# Altium PCB LORAPROJ_.PcbDoc (part 1 of 2)
Units mil, origin at the board's own origin, x right, y up, seen from the top; angles counter-clockwise.
Board outline 1950 x 1800 mil, 4 copper layers (Top Layer, L2 GND, L3 PWR, Bottom Layer), stack 62.45 mil thick; 95 components, 67 nets, 324 pads, 462 vias.
Unrouted connection lines stored in the file: 72.
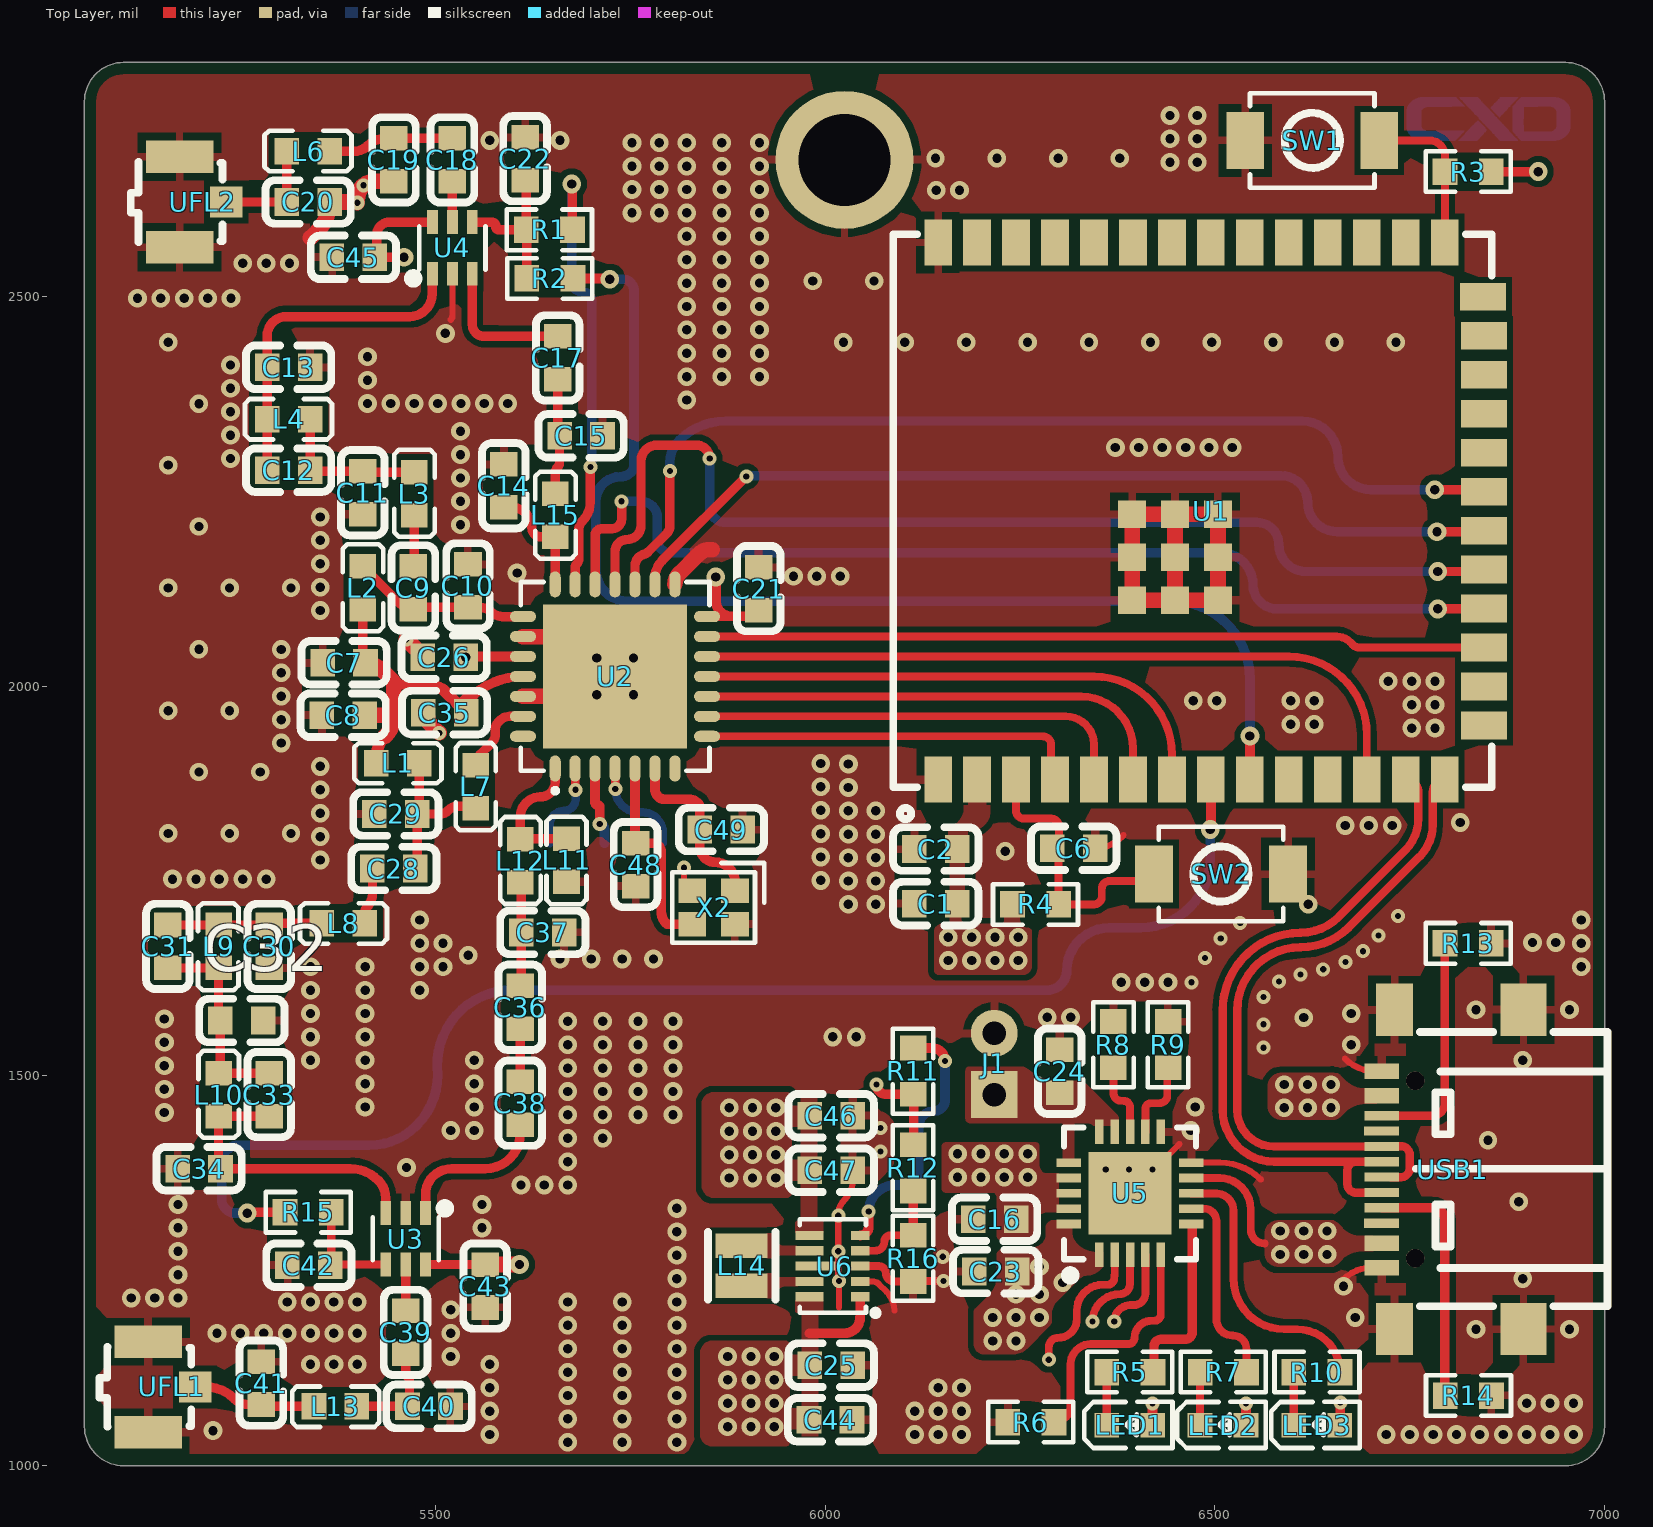
[diagram p0: Top Layer view]
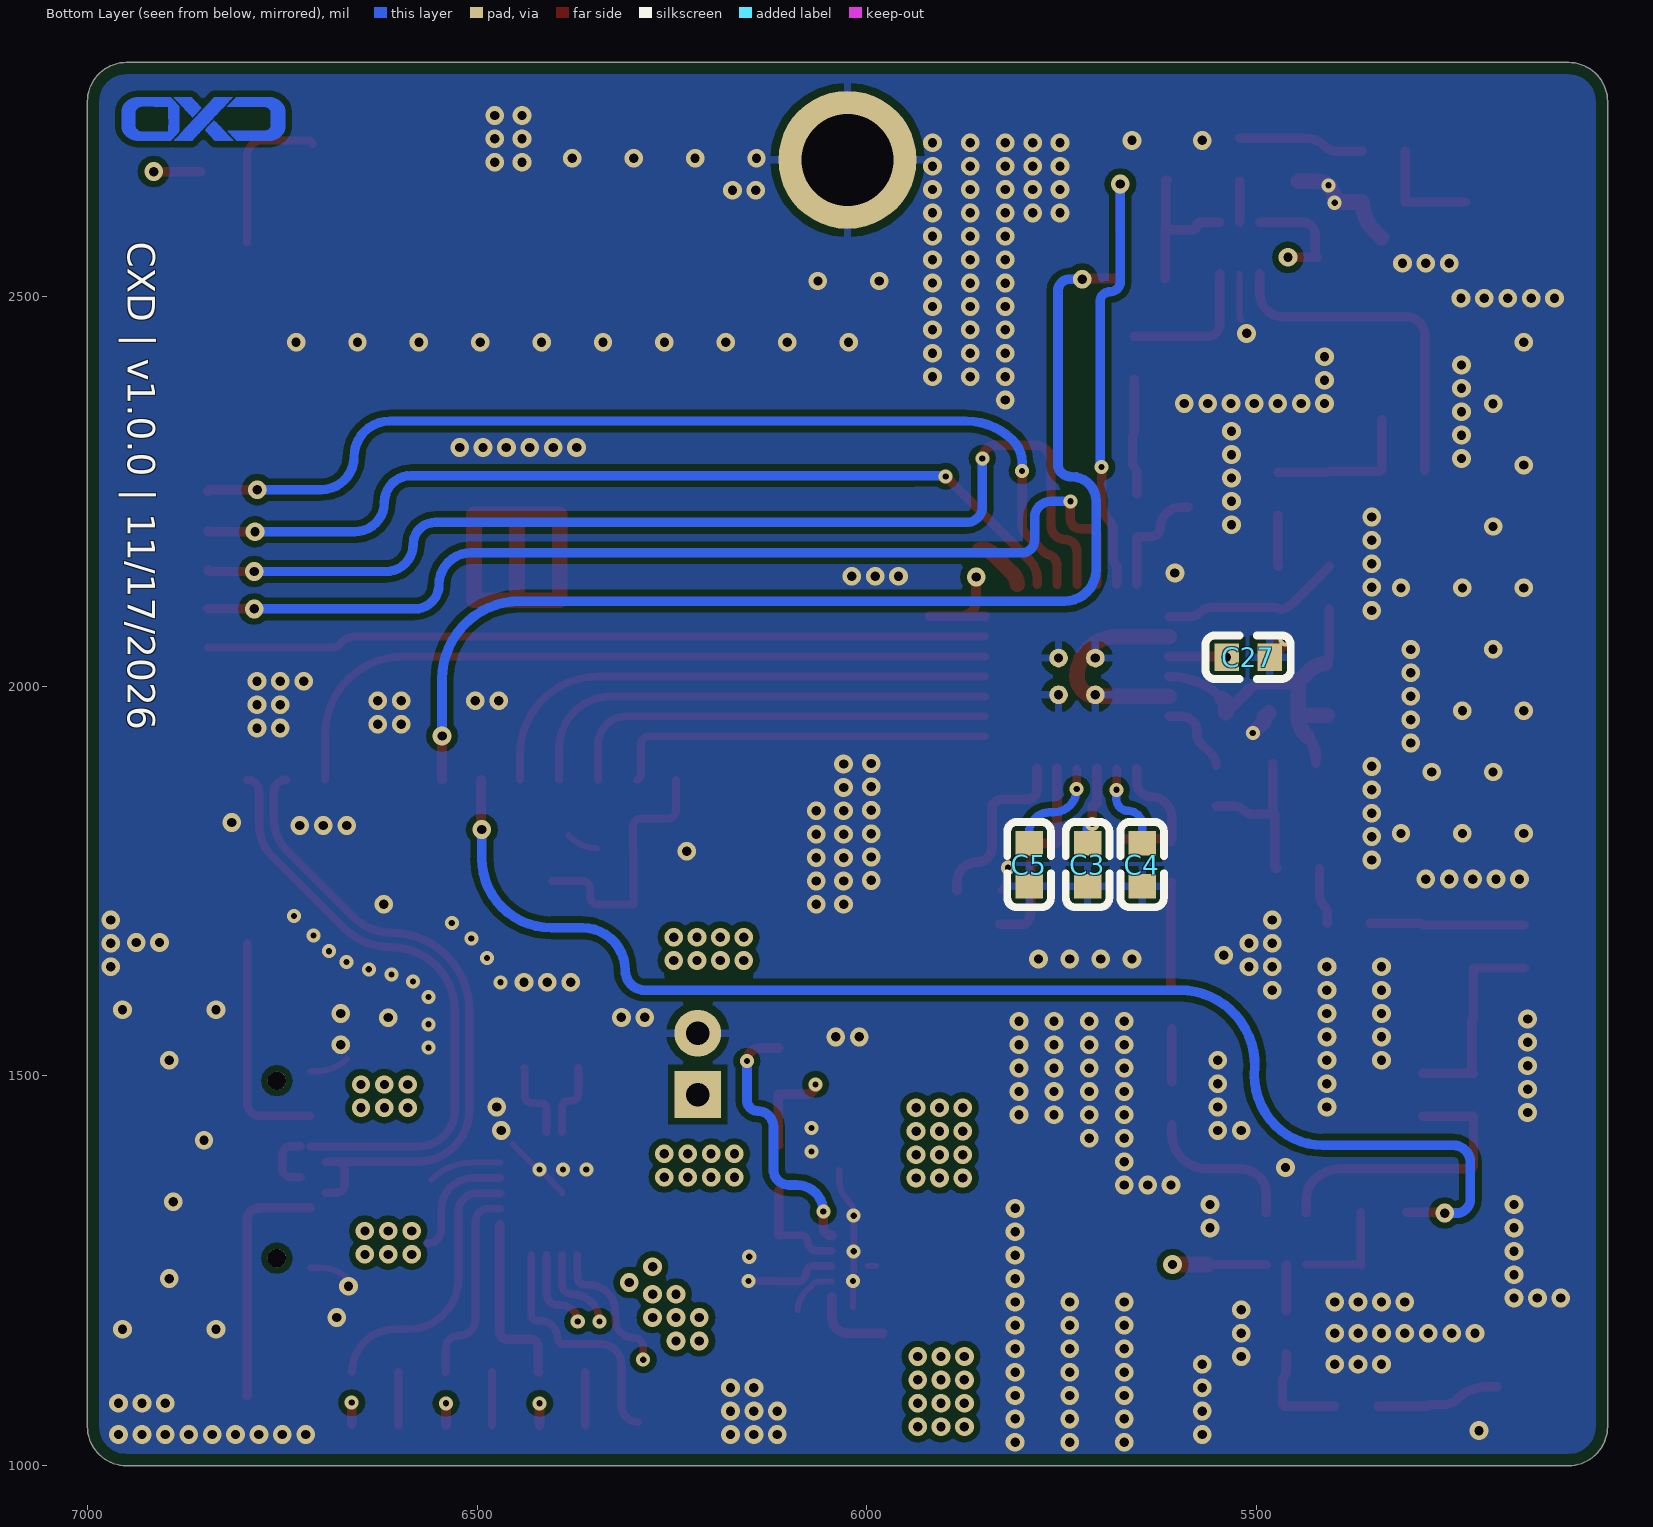
[diagram p1: Bottom Layer view, seen from below]
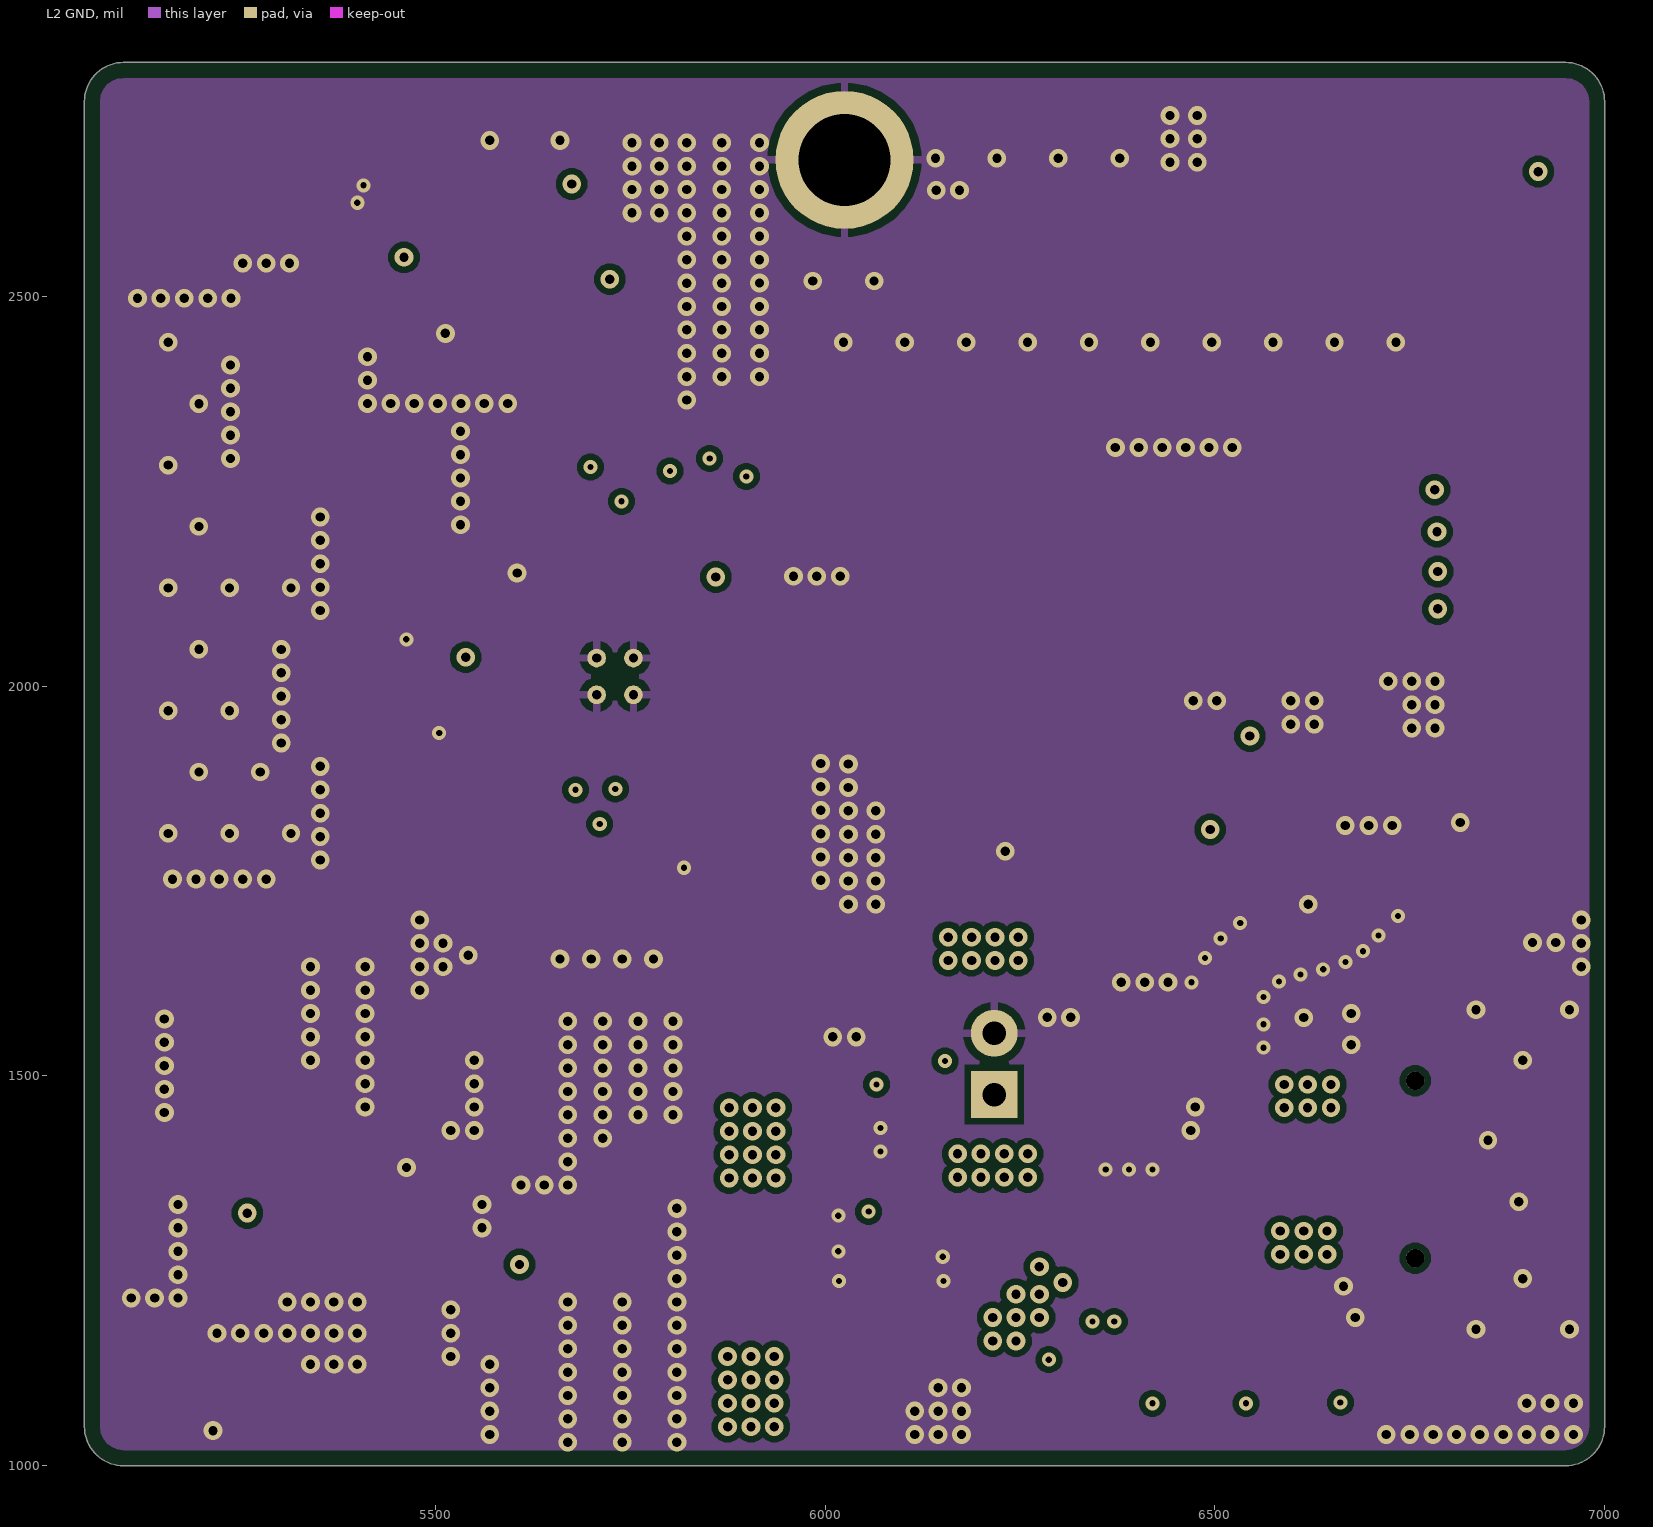
[diagram p2: L2 GND]
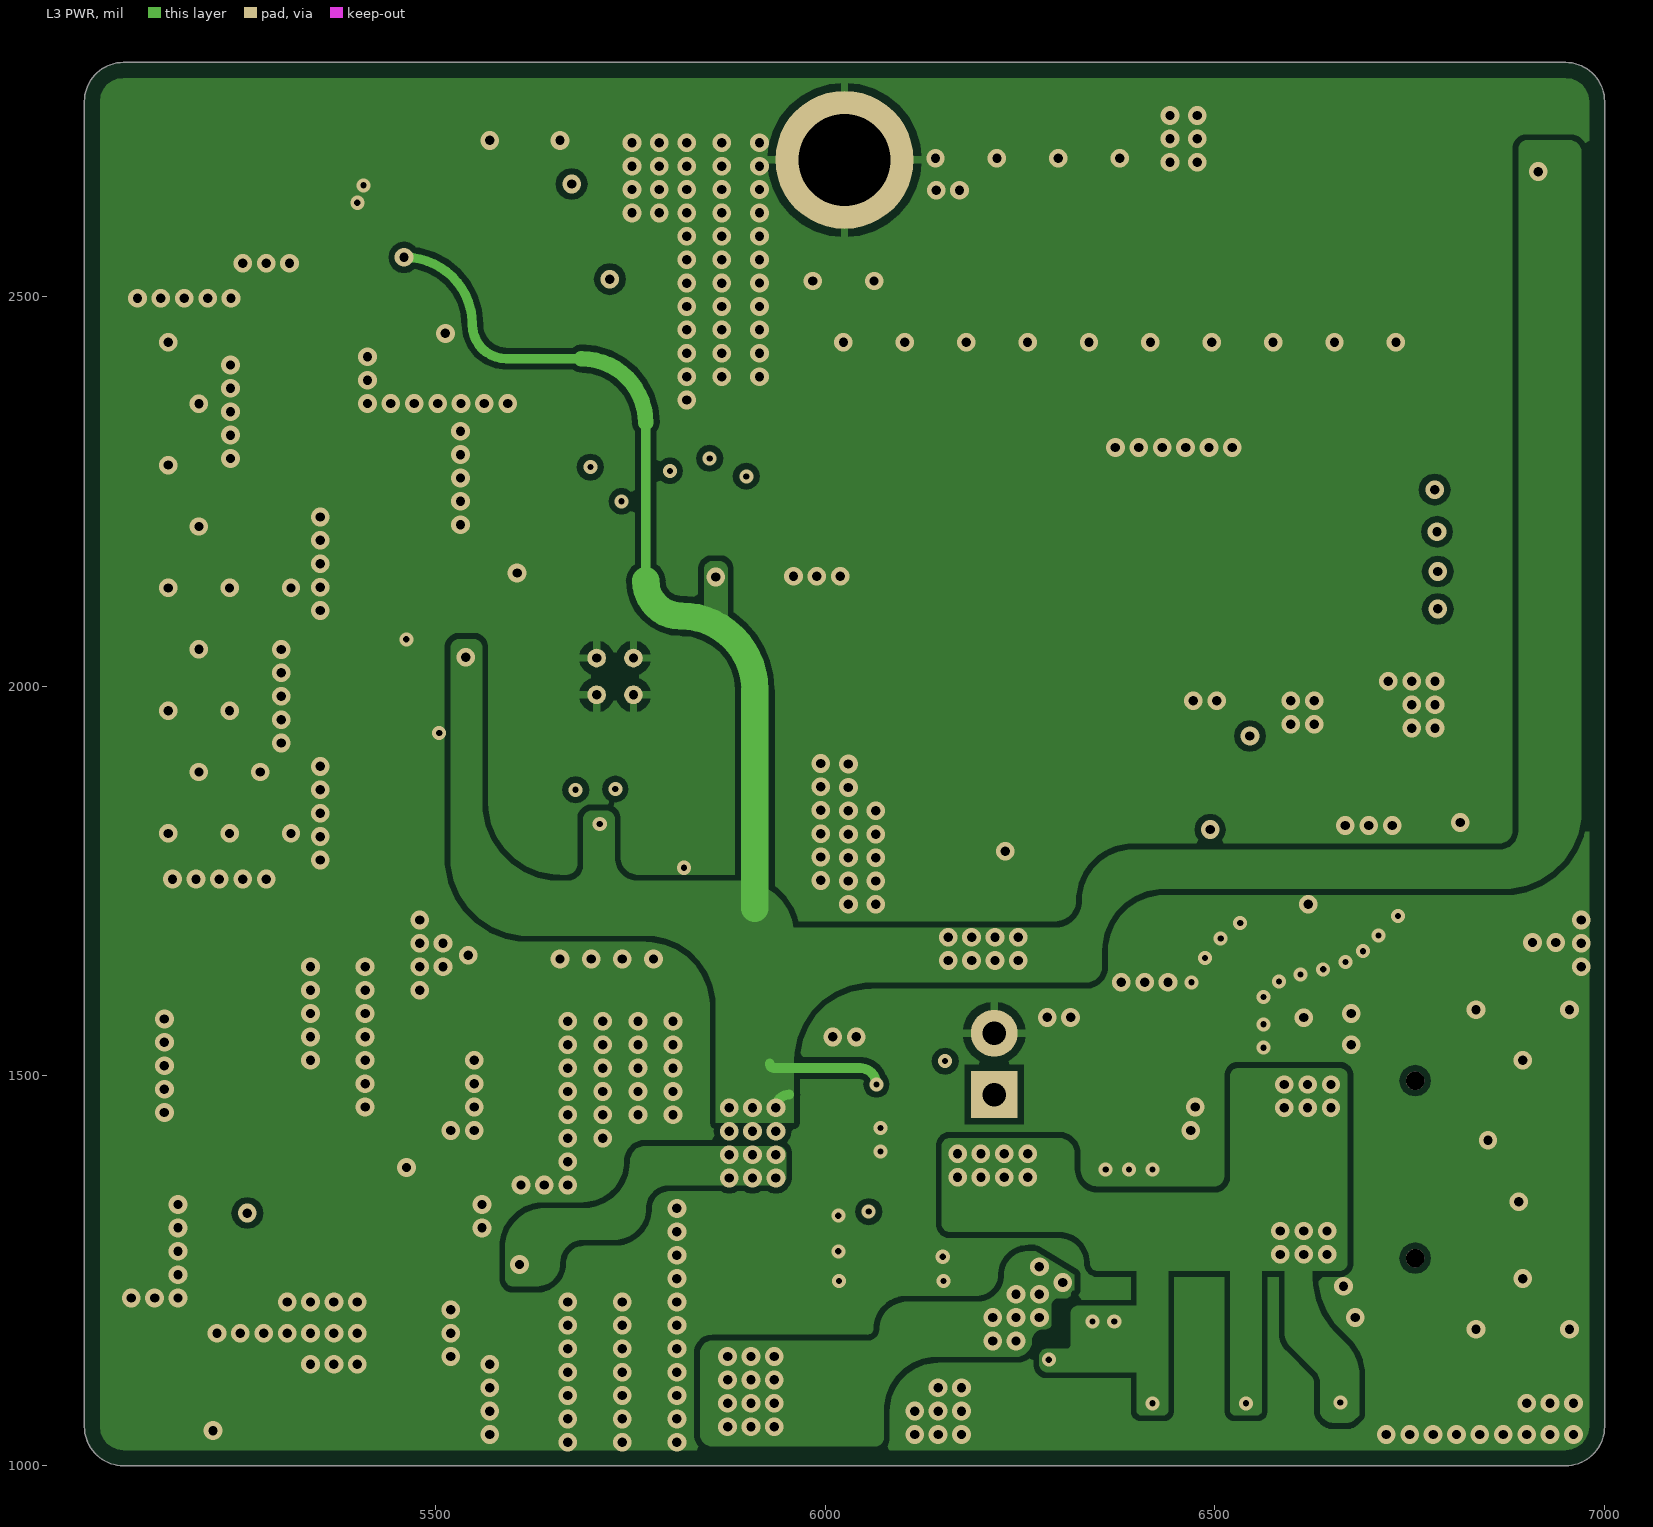
[diagram p3: L3 PWR]
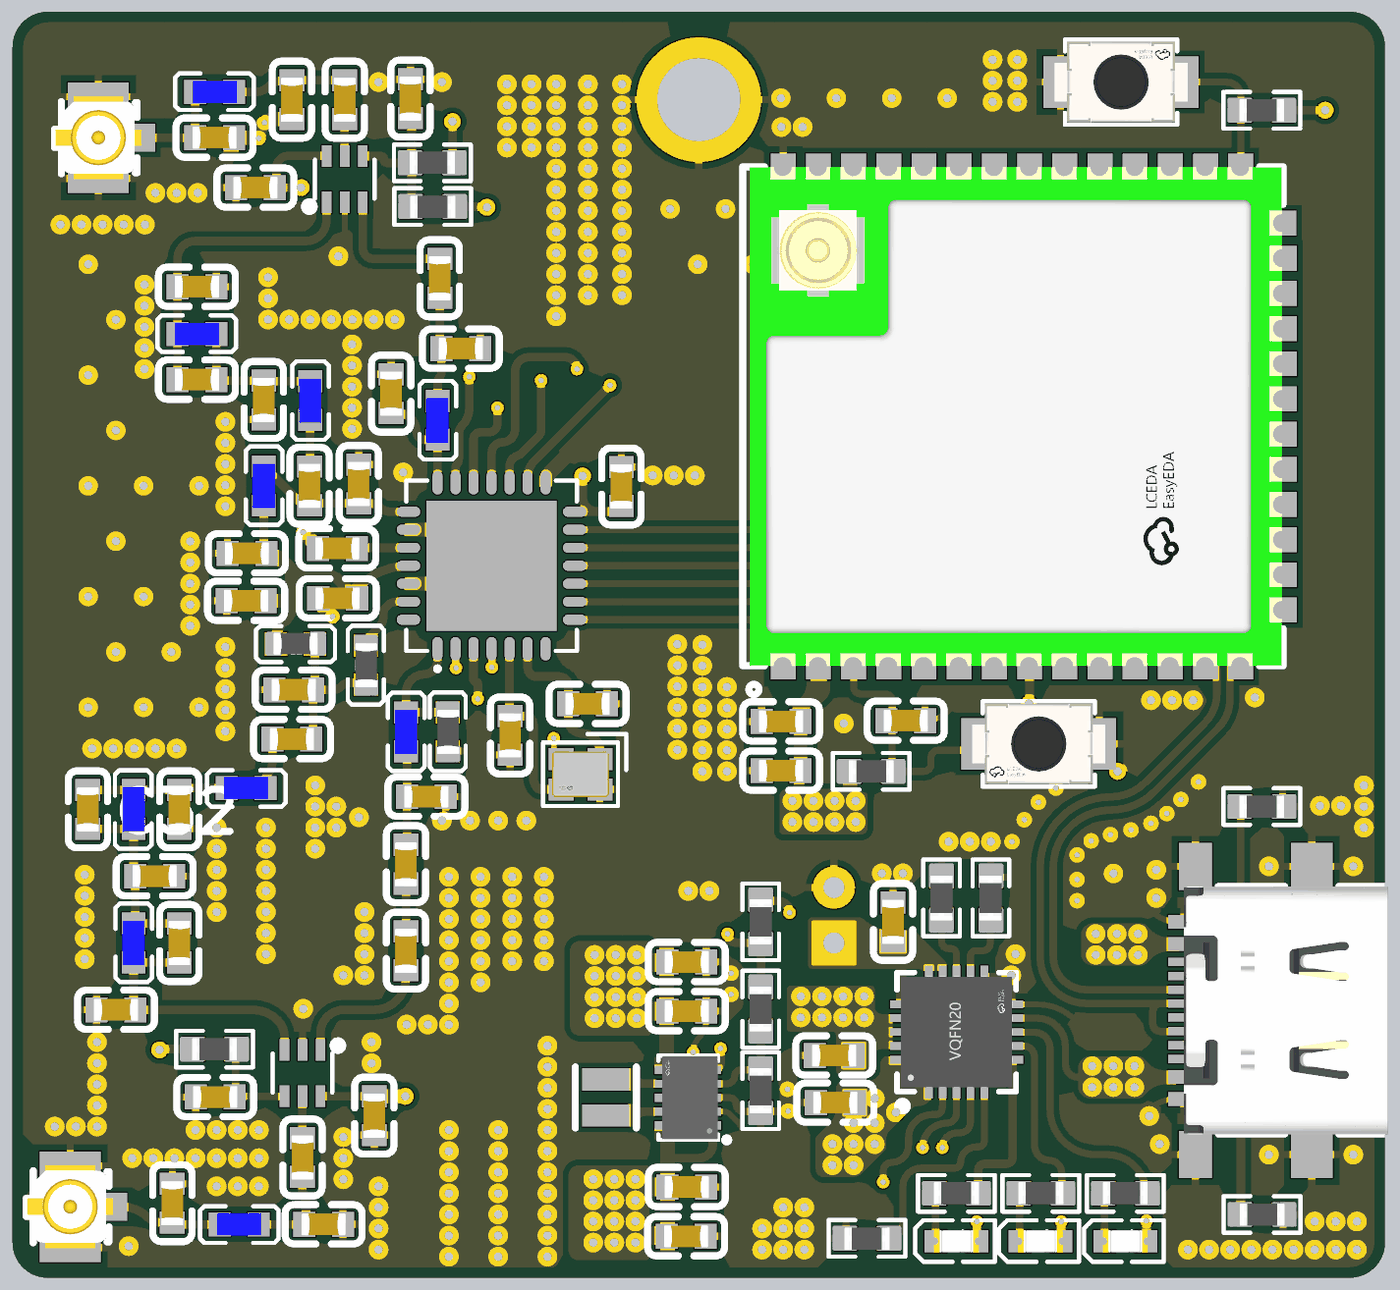
[diagram p5: 3D render of the assembled board from above, using the file's embedded part models]
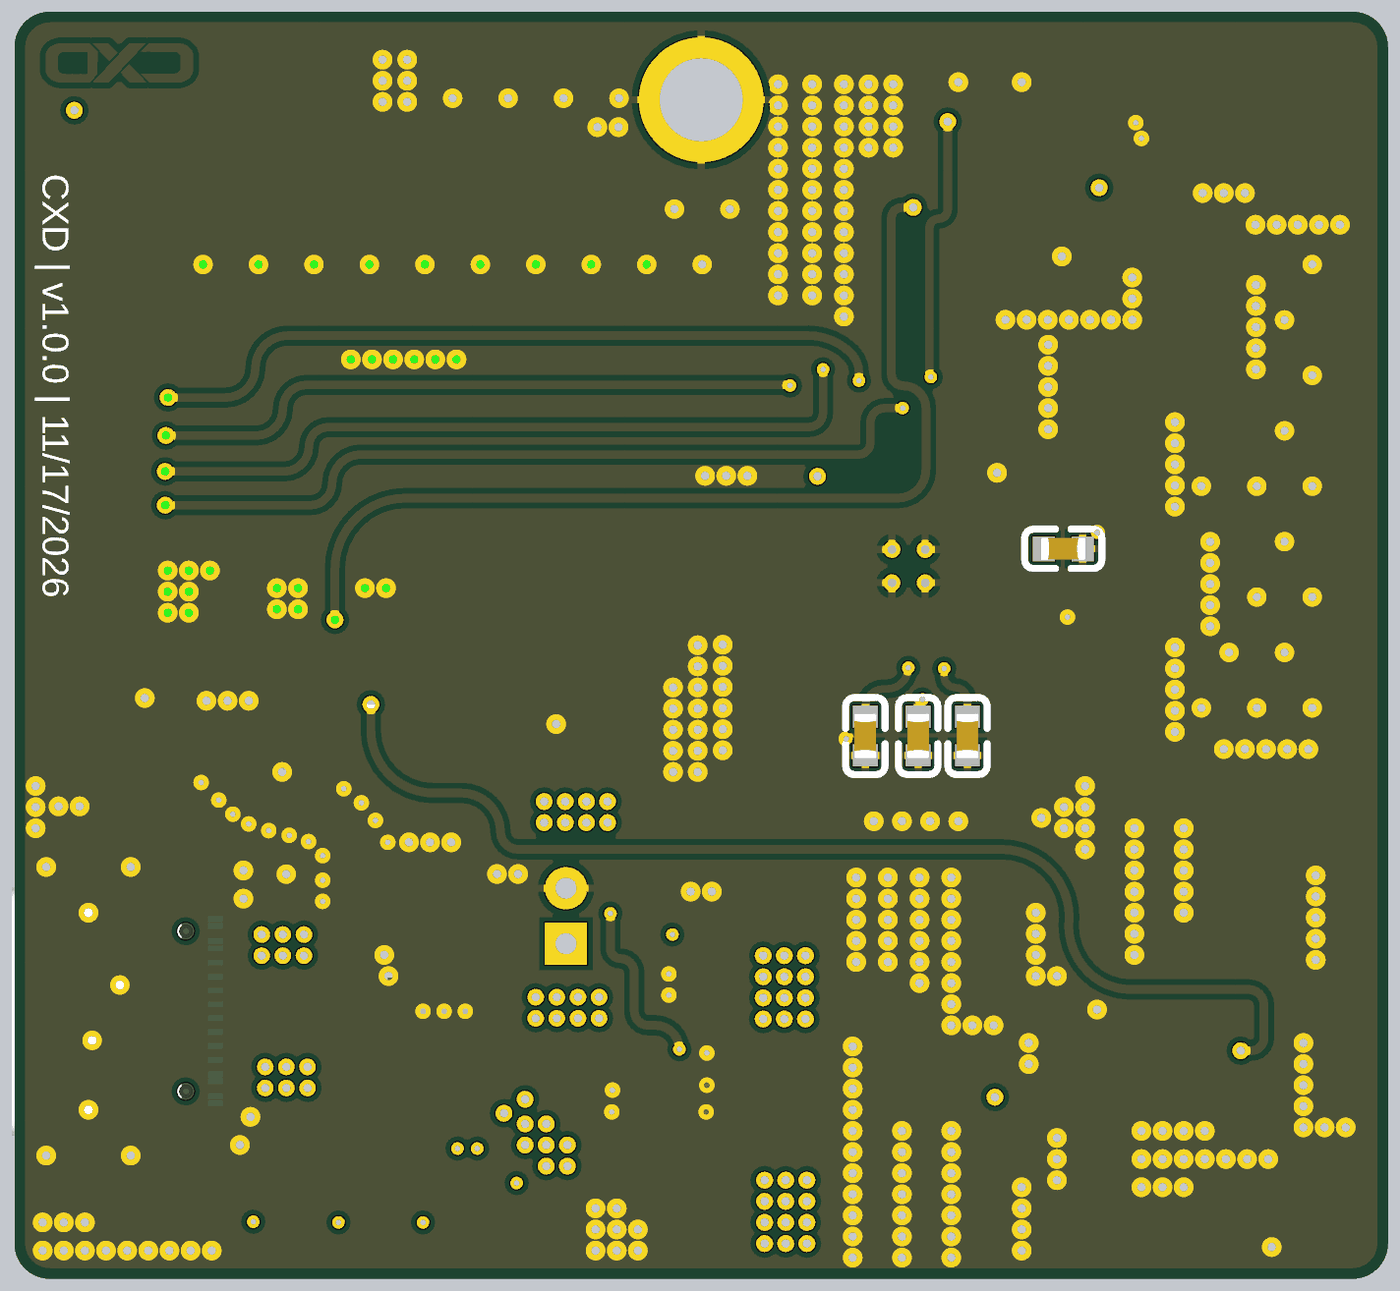
[diagram p6: 3D render of the assembled board from below, using the file's embedded part models]

## Layer stack, top to bottom
Top Solder: solder mask 0.4, Solder Resist, Dk 3.5
Top Layer: signal copper 1.38
Dielectric 1: prepreg 8.28, 7628 prepreg, Dk 4.4
L2 GND: signal copper 0.6
Dielectric2: core 41.93, FR-4 core, Dk 4.6
L3 PWR: signal copper 0.6
Dielectric3: prepreg 8.28, 7628 prepreg, Dk 4.4
Bottom Layer: signal copper 1.38
Bottom Solder: solder mask 0.4, Solder Resist, Dk 3.5

## Board outline
5050,1050 ccw(c5100,1050) 5100,1000 6950,1000 ccw(c6950,1050) 7000,1050 7000,2750 ccw(c6950,2750) 6950,2800 5100,2800 ccw(c5100,2750) 5050,2750

## Design rules (kind name [scope] priority, off if disabled: settings)
Clearance Clearance_GND_Pour [InPolygon And InNet('GND') vs Not InNetClass('RF')] p1: gap=8 ignorepadtopadclearanceinfootprint=FALSE // Pour-to-other-net clearance for manufacturability; RF excluded to keep GCPW 8 mil gap
Clearance Clearance_RF_GCPW [InNetClass('RF') vs InNet('GND')] p2: gap=8 ignorepadtopadclearanceinfootprint=FALSE // GCPW gap 0.2 mm between RF traces and GND pour
Clearance [All] p3: gap=6 ignorepadtopadclearanceinfootprint=FALSE // General clearance 0.15 mm (JLCPCB capable)
DiffPairsRouting [All] p1: maxlimit=8 minlimit=8 mostfreqgap=8 toplayer_minwidth=10.64 toplayer_maxwidth=10.64 toplayer_prefwidth=10.64 midlayer1_minwidth=10.64 midlayer1_maxwidth=10.64 midlayer1_prefwidth=10.64 midlayer2_minwidth=10.64 midlayer2_maxwidth=10.64 midlayer2_prefwidth=10.64 bottomlayer_minwidth=10.64 bottomlayer_maxwidth=10.64 bottomlayer_prefwidth=10.64 maxuncoupledlength=500
HoleSize [All] p1: absolutevalues=TRUE maxlimit=250 minlimit=8 maxpercent=80.000 minpercent=20.000 // JLCPCB min drill 0.2 mm
MinimumSolderMaskSliver [IsPad] p1: minsoldermaskwidth=3.5 // Relaxed from 10 mil (All,All): 3.5 mil, pads only. Via-to-via mask webs between stitching vias are not checked.
PolygonConnect GND_POUR_MAIN_Vias [IsVia vs IsPolygon And InNet('GND')] p1: connectstyle=Direct reliefconductorwidth=10 reliefentries=4 polygonreliefangle="90 Angle" airgapwidth=10 // Vias connect solid into all GND pours
PolygonConnect GND_POUR_MAIN [All vs IsPolygon And InNet('GND')] p2: connectstyle=Relief reliefconductorwidth=10 reliefentries=4 polygonreliefangle="90 Angle" airgapwidth=10 // Relief connects for pads on all GND pours
PolygonConnect PolygonConnect_1 [All] p3: connectstyle=Direct reliefconductorwidth=10 reliefentries=4 polygonreliefangle="90 Angle" airgapwidth=10
PolygonConnect PolygonConnect_Vias [IsVia] p4: connectstyle=Direct reliefconductorwidth=10 reliefentries=4 polygonreliefangle="90 Angle" airgapwidth=10 // Stitching / fence vias: direct connect
PolygonConnect PolygonConnect_SX1276 [InComponent('U2')] p5: connectstyle=Direct reliefconductorwidth=10 reliefentries=4 polygonreliefangle="90 Angle" airgapwidth=10 // SX1276 GND pins and exposed pad: direct connect for RF ground
PolygonConnect [All] p6: connectstyle=Relief reliefconductorwidth=10 reliefentries=4 polygonreliefangle="90 Angle" airgapwidth=10 // General pads: thermal relief 0.25 mm spokes
RoutingVias [All] p1: holewidth=12 width=24 viastyle="Through Hole" minholewidth=8 minwidth=16 maxholewidth=16 maxwidth=32 // Preferred via 0.3 mm hole / 0.6 mm pad
SilkToSilkClearance [All] p1 off: silktosilkclearance=4 // Disabled during layout: all violations are designator text collisions. Re-enable for silkscreen cleanup before fab.
SilkToSolderMaskClearance [IsPad] p1 off: minsilkscreentomaskgap=4 clearancetoexposedcopper=TRUE // Relaxed from 10 mil: 4 mil to mask opening = 6 mil (0.15 mm) to pad copper with 2 mil mask expansion
SolderMaskExpansion [All] p1: expansion=2 istentingtop=FALSE // 0.05 mm mask expansion
SupplyNets "Schematic Supply Nets_2" [InNet('+5')] p1: voltage=0.000
SupplyNets "Schematic Supply Nets_1" [InNet('GND')] p2: voltage=0.000
SupplyNets "Schematic Supply Nets" [InNet('+3.3')] p3: voltage=0.000
Width Width_RF_50ohm [InNetClass('RF')] p1: maxlimit=12.5 minlimit=11.5 preferedwidth=12.04 // 50 ohm coplanar (GCPW) on JLC04161H-7628, L1 ref L2: 12.04 mil trace, 8 mil gap (JLCPCB calculator)
Width Width_PWR [InNetClass('PWR')] p2: maxlimit=80 minlimit=10 preferedwidth=20 minimp=50.000000 maximp=50.000000 favimp=50.000000 // Power nets: min 0.3 / pref 0.5 / max 2.0 mm
Width [All] p3: maxlimit=40 minlimit=5 preferedwidth=10 minimp=50.000000 maximp=50.000000 favimp=50.000000 // General signals: min 0.127 / pref 0.2 / max 1.0 mm
25 further rules are at their usual default settings.

## Classes and differential pairs
component class Sheet3: C3 C4 C5 C7 C8 C9 C10 C11 C12 C13 C14 C15 C17 C18 C19 C20 C21 C22 C26 C27 C28 C29 C30 C31 C32 C33 C34 C35 C36 C37 C38 C39 C40 C41 C42 C43 C45 C48 C49 L1 L2 L3 L4 L6 L7 L8 L9 L10 L11 L12 L13 L15 R1 R2 R15 U2 U3 U4 UFL1 UFL2 X2
component class Sheet2: C16 C23 C24 C25 C44 C46 C47 J1 L14 LED1 LED2 LED3 R5 R6 R7 R8 R9 R10 R11 R12 R13 R14 R16 U5 U6 USB1
component class Sheet1: C1 C2 C6 R3 R4 SW1 SW2 U1
differential pair USB: +USB_P -USB_N

## Components (designator, comment, footprint, x,y, rotation, side; value= is the part's Value field where it differs from the comment)
C1 "CL10A106KP8NNNC" C19702 6142,1721 r0 top value=10µF
C2 "CL10B104KB8NNNC" C1591 6142,1791 r0 top value=100nF
C3 "CL10B104KB8NNNC" C1591 5717,1771 r270 bottom value=100nF
C4 "CL10B104KB8NNNC" C1591 5647,1771 r270 bottom value=100nF
C5 "CL10B104KB8NNNC" C1591 5792,1771 r270 bottom value=100nF
C6 "CL10A475KO8NNNC" C19666 6319,1792 r180 top value=4.7µF
C7 "CC0603JRNPO9BN101" C14665 5383,2030 r0 top value=100pF
C8 "CL10C470JB8NNNC" C1671 5381.88,1962.56 r0 top value=47pF
C9 "CL10C330JB8NNNC" C1663 5472,2126 r90 top value=33pF
C10 "CC0603BRNPO9BN1R5" C519100 5542,2128.56 r270 top value=1.5pF
C11 "0603CG3R3C500NT" C1660 5407,2248 r90 top value=3.3pF
C12 "GQM1875C2E1R2BB12D" C913582 5312,2277 r180 top value=1.2pF
C13 "0603CG3R3C500NT" C1660 5312,2409 r180 top value=3.3pF
C14 "DNP" C17388964 5588,2257 r270 top
C15 "GCM1885C2A7R5BA16D" C17388964 5687,2321 r180 top value=7.5pF
C16 "CL10A475KO8NNNC" C19666 6217.44,1316 r0 top value=4.7µF
C17 "CL10C470JB8NNNC" C1671 5657,2421 r270 top value=47pF
C18 "CL10C330JB8NNNC" C1663 5522,2675 r90 top value=33pF
C19 "0603CG3R3C500NT" C1660 5447,2675 r90 top value=3.3pF
C20 "0603CG3R3C500NT" C1660 5337,2621 r180 top value=3.3pF
C21 "CL10B104KB8NNNC" C1591 5915,2125 r270 top value=100nF
C22 "CL10B102KB8NNNC" C1588 5615.28,2676.55 r270 top value=1nF
C23 "CL10A475KO8NNNC" C19666 6219,1249 r0 top value=4.7µF
C24 "CL10A475KO8NNNC" C19666 6301,1506 r270 top value=4.7µF
C25 "CL10A226MP8NUNE" C86295 6008,1129 r180 top value=22µF
C26 "CL10C470JB8NNNC" C1671 5511.44,2037 r0 top value=47pF
C27 "CL10B104KB8NNNC" C1591 5511,2037 r0 bottom value=100nF
C28 "CL10C470JB8NNNC" C1671 5447,1766 r180 top value=47pF
C29 "CC0603JRNPO9BN130" C107036 5449.44,1836 r0 top value=13pF
C30 "CC0603JRNPO9BN110" C519393 5287,1666 r270 top value=11pF
C31 "0603CG2R2C500NT" C1651 5157,1666 r270 top value=2.2pF
C32 "CC0603CRNPO9BN4R3" C519375 5252,1571 r180 top value=4.3pF
C33 "DNP" C17388964 5287,1476 r90 top
C34 "DNP" C17388964 5197,1381 r180 top
C35 "CC0603KRX7R9BB103" C100042 5512,1966 r0 top value=10nF
C36 "CC0603BRNPO9BN2R0" C513620 5609,1588 r270 top value=2pF
C37 "DNP" C17388964 5638,1684 r0 top
C38 "CL10C470JB8NNNC" C1671 5609,1465 r270 top value=47pF
C39 "CL10C470JB8NNNC" C1671 5462,1171 r270 top value=47pF
C40 "DNP" C17388964 5492,1076 r0 top
C41 "DNP" C17388964 5277,1106 r90 top
C42 "CL10B102KB8NNNC" C1588 5338,1257 r0 top value=1nF
C43 "CL10B102KB8NNNC" C1588 5564,1230.44 r90 top value=1nF
C44 "CL10B104KB8NNNC" C1591 6007,1059 r180 top value=100nF
C45 "CL10B102KB8NNNC" C1588 5395,2550 r0 top value=1nF
C46 "CL10A226MP8NUNE" C86295 6008,1449 r180 top value=22µF
C47 "CL10B104KB8NNNC" C1591 6008,1379 r180 top value=100nF
C48 "CC0603JRNPO9BN120" C107034 5757,1771 r90 top value=12pF
C49 "CC0603JRNPO9BN120" C107034 5867,1816 r180 top value=12pF
J1 "2.0 2P" "2.0 2P-Footprint-1" 6217,1476 r90 top
L1 "LQW18AN47NG00D" C98076 5452,1901 r0 top value=47nH
L2 "LQW18AN33NG00D" C98073 5407,2126 r270 top value=33nH
L3 "AHW1608C-6N8JTF" C6807999 5473,2247 r270 top value=6.8nH
L4 "LQW18AN6N2C00D" C98083 5312,2342 r0 top value=6.2nH
L6 "LQW18AN8N2D00D" C98087 5337,2686 r0 top value=8.2nH
L7 "LQW18AN4N3C00D" C113127 5552,1871 r270 top value=4.3nH
L8 "LQW18AN11NG00D" C701196 5382,1696 r180 top value=11nH
L9 "LQW18AN12NG00D" C98068 5222,1666 r90 top value=12nH
L10 "RC0603JR-070RL" C701196 5222,1476 r270 top value=0R
L11 "LQW18AN15NG00D" C86132 5668.37,1776.39 r270 top value=15nH
L12 "RC0603JR-070RL" C701196 5609,1776 r270 top value=0R
L13 "RC0603JR-070RL" C701196 5372,1076 r180 top value=0R
L14 "hctc-201610-1r0-m" Inductor 5926.31,1223.1 r90 top
L15 "LQW18AN12NG00D" C98068 5654,2219 r270 top value=12nH
LED1 "HL-PST-1608H233W(9000-16000K)" C219226 6391,1052 r0 top
LED2 "HL-PST-1608H233W(9000-16000K)" C219226 6510.49,1052.01 r0 top
LED3 "HL-PST-1608H233W(9000-16000K)" C219226 6631,1052 r0 top
R1 "NC" C22548 5646.45,2585.28 r0 top
R2 "RC0603FR-071KL" C22548 5647,2523 r180 top value=1k
R3 "RC0603FR-0710KL" C98220 6825,2660 r180 top value=10k
R4 "RC0603FR-0710KL" C98220 6270,1720 r0 top value=10k
R5 "RC0603FR-075K1L" C105580 6391,1120 r0 top value=5.1k
R6 "RC0603FR-0710KL" C98220 6264,1056 r180 top value=10k
R7 "RC0603FR-075K1L" C105580 6511,1120 r0 top value=5.1k
R8 "0603WAF2001T5E" C22975 6370,1540 r90 top value=2k
R9 "RC0603FR-0710KL" C98220 6440,1540 r90 top value=10k
R10 "RC0603FR-075K1L" C105580 6631,1120 r0 top value=5.1k
R11 "RC0603FR-07100KL" C14675 6113,1506 r270 top value=100k
R12 "RT0603BRD07511KL" C861454 6113,1382 r90 top value=511k
R13 "RC0603FR-075K1L" C105580 6825,1670 r180 top value=5.1k
R14 "RC0603FR-075K1L" C105580 6825.34,1090 r180 top value=5.1k
R15 "RC0603FR-071KL" C22548 5337,1325 r0 top value=1k
R16 "RC0603FR-0791KL" C137671 6113,1266 r90 top value=91k
SW1 "TS-1088-AR02016" C720477 6625,2700 r0 top
SW2 "TS-1088-AR02016" C720477 6508,1759 r180 top
U1 "ESP32-S3-WROOM-1U-N16R8" C3013946 6495.19,2224.49 r90 top
U2 "SX1276IMLTRT" C80171 5730.62,2012.38 r0 top value=-
U3 "PE4259-63" C470892 5462,1291 r180 top
U4 "PE4259-63" C470892 5522,2562 r0 top
U5 "MCP73871-2CCI/ML" C5121473 6391.26,1349.37 r0 top
U6 "TPS63802DLAT" C1849531 6012.61,1256 r90 top
UFL1 "U.FL-R-SMT-1(80)" C88374 5162,1101 r90 top
UFL2 "U.FL-R-SMT-1(80)" C88374 5202,2621 r90 top
USB1 "TYPE-C 16P QTWT" C5187472 6805,1380 r90 top
X2 "XL7EL89CKI-111YLC-32M" C2965582 5857,1716 r180 top value=32MHz

## Footprints (in the part's own frame and the unit in brackets; to place one, negate y for a bottom-side part, rotate by r counter-clockwise, add the part's x,y. Pads: shape width x height; smd on the part's side, far side on the other; paste and mask are expansions set on the pad)
"2.0 2P-Footprint-1" [mil]
  rect 60x60 hole 30: 1(0,0)
  round 60 hole 30: 2(78.74,0)
C1588 [mm]
  rect 0.8x0.9 smd paste+0 mask+0.051: 1(-0.7,0) 2(0.7,0)
  silkscreen extent -1.39,-0.71 1.39,0.71, body extent -0.8,-0.4 0.8,0.4, height 0.4
C1591 [mm]
  rect 0.8x0.9 smd paste+0 mask+0.051: 1(-0.7,0) 2(0.7,0)
  silkscreen extent -1.39,-0.71 1.39,0.71, body extent -0.8,-0.4 0.8,0.4, height 0.4
C1651 [mm]
  rect 0.8x0.9 smd paste+0 mask+0.051: 1(-0.7,0) 2(0.7,0)
  silkscreen extent -1.39,-0.71 1.39,0.71, body extent -0.8,-0.4 0.8,0.4, height 0.4
C1660 [mm]
  rect 0.8x0.9 smd paste+0 mask+0.051: 1(-0.7,0) 2(0.7,0)
  silkscreen extent -1.39,-0.71 1.39,0.71, body extent -0.8,-0.4 0.8,0.4, height 0.4
C1663 [mm]
  rect 0.8x0.9 smd paste+0 mask+0.051: 1(-0.7,0) 2(0.7,0)
  silkscreen extent -1.39,-0.71 1.39,0.71, body extent -0.8,-0.4 0.8,0.4, height 0.4
C1671 [mm]
  rect 0.8x0.9 smd paste+0 mask+0.051: 1(-0.7,0) 2(0.7,0)
  silkscreen extent -1.39,-0.71 1.39,0.71, body extent -0.8,-0.4 0.8,0.4, height 0.4
C14665 [mm]
  rect 0.8x0.9 smd paste+0 mask+0.051: 1(-0.7,0) 2(0.7,0)
  silkscreen extent -1.39,-0.71 1.39,0.71, body extent -0.8,-0.4 0.8,0.4, height 0.4
C14675 [mil]
  rect 31.75x34.02 smd paste-3937.01 mask+2: 1(-29.66,0) 2(29.66,0)
  silkscreen extent -55,-26 55,26, body extent -32,-16 32,16, height 17
C19666 [mm]
  rect 0.8x0.9 smd paste+0 mask+0.051: 1(-0.7,0) 2(0.7,0)
  silkscreen extent -1.39,-0.71 1.39,0.71, body extent -0.8,-0.4 0.8,0.4, height 0.4
C19702 [mm]
  rect 0.8x0.9 smd paste+0 mask+0.051: 1(-0.7,0) 2(0.7,0)
  silkscreen extent -1.39,-0.71 1.39,0.71, body extent -0.8,-0.4 0.8,0.4, height 0.4
C22548 [mil]
  rect 31.75x34.02 smd paste-3937.01 mask+2: 1(-29.66,0) 2(29.66,0)
  silkscreen extent -55,-26 55,26, body extent -32,-16 32,16, height 17
C22975 [mil]
  rect 31.75x34.02 smd paste-3937.01 mask+2: 1(-29.66,0) 2(29.66,0)
  silkscreen extent -55,-26 55,26, body extent -32,-16 32,16, height 17
C80171 [mm]
  oval 0.364x0.847 smd paste+0 mask+0.051: 1(-1.95,-2.998) 2(-1.3,-2.998) 3(-0.65,-2.998) 4(0,-2.998) 5(0.65,-2.998) 6(1.3,-2.998) 7(1.95,-2.998) 15(1.95,2.998) 16(1.3,2.998) 17(0.65,2.998) 18(0,2.998) 19(-0.65,2.998) 20(-1.3,2.998) 21(-1.95,2.998)
  oval 0.847x0.364 smd paste+0 mask+0.051: 8(2.998,-1.95) 9(2.998,-1.3) 10(2.998,-0.65) 11(2.998,0) 12(2.998,0.65) 13(2.998,1.3) 14(2.998,1.95) 22(-2.998,1.95) 23(-2.998,1.3) 24(-2.998,0.65) 25(-2.998,0) 26(-2.998,-0.65) 27(-2.998,-1.3) 28(-2.998,-1.95)
  round 0.61 hole 0.305 paste-2539.97: 29(-0.6,-0.6) 29(-0.6,0.6) 29(0.6,-0.6) 29(0.6,0.6)
  rect 4.7x4.7 smd paste+0 mask+0.051: 29(0,0)
  silkscreen extent -3.08,-3.8 3.08,3.08
C86132 [mm]
  rect 0.8x0.864 smd paste-100 mask+0.051: 1(-0.7,0) 2(0.7,0)
  silkscreen extent -1.42,-0.65 1.42,0.65, body extent -0.8,-0.38 0.8,0.42, height 0.25
C86295 [mm]
  rect 0.8x0.9 smd paste+0 mask+0.051: 1(-0.7,0) 2(0.7,0)
  silkscreen extent -1.39,-0.71 1.39,0.71, body extent -0.8,-0.4 0.8,0.4, height 0.4
C88374 [mm]
  rect 1x1.05 smd paste+0 mask+0.05: 1(0,-0.762)
  rect 1.05x2.2 smd paste+0 mask+0.05: 2(-1.475,0.762) 3(1.475,0.762)
  silkscreen extent -1.3,-0.63 1.3,2.35, body extent -1.5,-0.79 1.5,2.31, height 1.25
C98068 [mm]
  rect 0.8x0.864 smd paste+0 mask+0.051: 1(0.7,0) 2(-0.7,0)
  silkscreen extent -1.42,-0.65 1.41,0.67, body extent -0.8,-0.4 0.81,0.4, height 0.7
C98073 [mm]
  rect 0.8x0.864 smd paste+0 mask+0.051: 1(0.7,0) 2(-0.7,0)
  silkscreen extent -1.42,-0.65 1.41,0.67, body extent -0.8,-0.4 0.81,0.4, height 0.7
C98076 [mm]
  rect 0.8x0.864 smd paste-100 mask+0.051: 1(-0.7,0) 2(0.7,0)
  silkscreen extent -1.42,-0.65 1.42,0.65, body extent -0.8,-0.38 0.8,0.42, height 0.25
C98083 [mm]
  rect 0.8x0.864 smd paste+0 mask+0.051: 1(0.7,0) 2(-0.7,0)
  silkscreen extent -1.42,-0.65 1.41,0.67, body extent -0.8,-0.4 0.81,0.4, height 0.7
C98087 [mm]
  rect 0.8x0.864 smd paste+0 mask+0.051: 1(0.7,0) 2(-0.7,0)
  silkscreen extent -1.42,-0.65 1.41,0.67, body extent -0.8,-0.4 0.81,0.4, height 0.7
C98220 [mil]
  rect 31.75x34.02 smd paste-3937.01 mask+2: 1(-29.66,0) 2(29.66,0)
  silkscreen extent -55,-26 55,26, body extent -32,-16 32,16, height 17
C100042 [mm]
  rect 0.8x0.9 smd paste+0 mask+0.051: 1(-0.7,0) 2(0.7,0)
  silkscreen extent -1.39,-0.71 1.39,0.71, body extent -0.8,-0.4 0.8,0.4, height 0.4
C105580 [mil]
  rect 31.75x34.02 smd paste-3937.01 mask+2: 1(-29.66,0) 2(29.66,0)
  silkscreen extent -55,-26 55,26, body extent -32,-16 32,16, height 17
C107034 [mm]
  rect 0.8x0.9 smd paste+0 mask+0.051: 1(-0.7,0) 2(0.7,0)
  silkscreen extent -1.39,-0.71 1.39,0.71, body extent -0.8,-0.4 0.8,0.4, height 0.4
C107036 [mm]
  rect 0.8x0.9 smd paste+0 mask+0.051: 1(-0.7,0) 2(0.7,0)
  silkscreen extent -1.39,-0.71 1.39,0.71, body extent -0.8,-0.4 0.8,0.4, height 0.4
C113127 [mm]
  rect 0.8x0.864 smd paste-100 mask+0.051: 1(-0.7,0) 2(0.7,0)
  silkscreen extent -1.42,-0.65 1.42,0.65, body extent -0.8,-0.38 0.8,0.42, height 0.25
C137671 [mil]
  rect 31.75x34.02 smd paste-3937.01 mask+2: 1(-29.66,0) 2(29.66,0)
  silkscreen extent -55,-26 55,26, body extent -32,-16 32,16, height 17
C219226 [mm]
  rect 0.8x0.8 smd paste+0 mask+0.051: 1(-0.749,0) 2(0.749,0)
  silkscreen extent -1.49,-0.75 1.39,0.76, body extent -0.81,-0.41 0.81,0.41, height 0.55
C470892 [mm]
  rect 0.35x0.78 smd paste+0 mask+0.051: 1(-0.65,-0.84) 2(0,-0.84) 3(0.65,-0.84) 4(0.65,0.84) 5(0,0.84) 6(-0.65,0.84)
  silkscreen extent -1.43,-1.14 1.08,0.7
C513620 [mm]
  rect 0.8x0.9 smd paste+0 mask+0.051: 1(-0.7,0) 2(0.7,0)
  silkscreen extent -1.39,-0.71 1.39,0.71, body extent -0.8,-0.4 0.8,0.4, height 0.4
C519100 [mm]
  rect 0.8x0.9 smd paste+0 mask+0.051: 1(-0.7,0) 2(0.7,0)
  silkscreen extent -1.39,-0.71 1.39,0.71, body extent -0.8,-0.4 0.8,0.4, height 0.4
C519375 [mm]
  rect 0.8x0.9 smd paste+0 mask+0.051: 1(-0.7,0) 2(0.7,0)
  silkscreen extent -1.39,-0.71 1.39,0.71, body extent -0.8,-0.4 0.8,0.4, height 0.4
C519393 [mm]
  rect 0.8x0.9 smd paste+0 mask+0.051: 1(-0.7,0) 2(0.7,0)
  silkscreen extent -1.39,-0.71 1.39,0.71, body extent -0.8,-0.4 0.8,0.4, height 0.4
C701196 [mm]
  rect 0.8x0.864 smd paste+0 mask+0.051: 1(0.7,0) 2(-0.7,0)
  silkscreen extent -1.42,-0.65 1.41,0.67, body extent -0.8,-0.4 0.81,0.4, height 0.7
C720477 [mm]
  rect 1.23x1.86 smd paste+0 mask+0.051: 1(-2.185,0) 2(2.185,0)
  silkscreen extent -2.03,-1.54 2.03,1.54, body extent -2.4,-1.45 2.4,1.45, height 1.95
C861454 [mil]
  rect 31.75x34.02 smd paste-3937.01 mask+2: 1(-29.66,0) 2(29.66,0)
  silkscreen extent -55,-26 55,26, body extent -32,-16 32,16, height 17
C913582 [mm]
  rect 0.8x0.9 smd paste+0 mask+0.051: 1(-0.7,0) 2(0.7,0)
  silkscreen extent -1.39,-0.71 1.39,0.71, body extent -0.8,-0.4 0.8,0.4, height 0.4
C1849531 [mm]
  rect 0.3x0.6 smd paste+0 mask+0.051: 1(-1,-0.825) 2(-0.5,-0.825) 3(0,-0.825) 4(0.5,-0.825) 5(1,-0.825)
  rect 0.3x0.9 smd paste+0 mask+0.051: 6(1,0.825) 7(0.5,0.825) 9(-0.5,0.825) 10(-1,0.825)
  rect 0.3x1.3 smd paste+0 mask+0.051: 8(0,0.625)
  silkscreen extent -1.62,-1.42 1.52,1.14, body extent -1.5,-1 1.5,1, height 0.58
C2965582 [mm]
  rect 0.9x0.8 smd paste+0 mask+0.051: 1(-0.7,-0.55) 2(0.7,-0.55) 3(0.7,0.55) 4(-0.7,0.55)
  silkscreen extent -1.65,-1.45 1.35,1.15, body extent -1.02,-0.83 1.02,0.82, height 0.45
C3013946 [mm]
  rect 1.5x0.9 smd paste+0 mask+0.05: 1(-8.75,8.895) 2(-8.75,7.625) 3(-8.75,6.355) 4(-8.75,5.085) 5(-8.75,3.815) 6(-8.75,2.545) 7(-8.75,1.275) 8(-8.75,0.005) 9(-8.75,-1.265) 10(-8.75,-2.535) 11(-8.75,-3.805) 12(-8.75,-5.075) 13(-8.75,-6.345) 14(-8.75,-7.615) 27(8.75,-7.615) 28(8.75,-6.345) 29(8.75,-5.075) 30(8.75,-3.805) 31(8.75,-2.535) 32(8.75,-1.265) 33(8.75,0.005) 34(8.75,1.275) 35(8.75,2.545) 36(8.75,3.815) 37(8.75,5.085) 38(8.75,6.355) 39(8.75,7.625) 40(8.75,8.895)
  rect 0.9x1.5 smd paste+0 mask+0.05: 15(-6.985,-8.895) 16(-5.715,-8.895) 17(-4.445,-8.895) 18(-3.175,-8.895) 19(-1.905,-8.895) 20(-0.635,-8.895) 21(0.635,-8.895) 22(1.905,-8.895) 23(3.175,-8.895) 24(4.445,-8.895) 25(5.715,-8.895) 26(6.985,-8.865)
  rect 0.9x0.9 smd paste+0 mask+0.051: 41(-2.9,-0.225) 41(-2.9,1.175) 41(-2.9,2.575) 41(-1.5,2.575) 41(-1.5,-0.225) 41(-1.5,1.175) 41(-0.1,2.575) 41(-0.1,1.175) 41(-0.1,-0.225)
  silkscreen extent -10.04,-9.14 9.02,10.36, body extent -9.01,-9.11 9.01,10.11, height 3.21
C5121473 [mm]
  rect 0.28x0.8 smd paste-100 mask+0.051: 1(-1,-2) 2(-0.5,-2) 3(0,-2) 4(0.5,-2) 5(1,-2) 11(1,2) 12(0.5,2) 13(0,2) 14(-0.5,2) 15(-1,2)
  rect 0.8x0.28 smd paste-100 mask+0.051: 6(2,-1) 7(2,-0.5) 8(2,0) 9(2,0.5) 10(2,1) 16(-2,1) 17(-2,0.5) 18(-2,0) 19(-2,-0.5) 20(-2,-1)
  rect 2.7x2.7 smd paste-100 mask+0.051: 21(0,0)
  silkscreen extent -2.15,-2.82 2.15,2.15, body extent -2.01,-2.01 2.01,2.01, height 1
C5187472 [mm]
  rect 1.7x1.5 smd paste+0 mask+0.051: 0(-5.2,-2.309) 0(5.2,-2.309)
  rect 1.7x1.2 smd paste+0 mask+0.051: 0(-5.2,1.891) 0(5.2,1.891)
  rect 0.5x1.14 smd paste+0 mask+0.051: A1B12(-3.2,2.308) A4B9(-2.4,2.308) B1A12(3.2,2.308) B4A9(2.4,2.308)
  rect 0.3x1.14 smd paste+0 mask+0.051: A5(-1.25,2.308) A6(-0.25,2.308) A7(0.25,2.308) A8(1.25,2.309) B5(1.75,2.308) B6(0.75,2.308) B7(-0.75,2.308) B8(-1.75,2.309)
  round 0.6 hole 0.6 unplated: ""(-2.89,1.221) ""(2.89,1.221)
  silkscreen extent -4.46,-5.05 4.48,1.2, body extent -5.67,-5.05 5.67,2.55, height 1.61
C6807999 [mm]
  rect 0.8x0.864 smd paste+0 mask+0.051: 1(0.7,0) 2(-0.7,0)
  silkscreen extent -1.42,-0.65 1.41,0.67, body extent -0.8,-0.4 0.81,0.4, height 0.7
C17388964 [mm]
  rect 0.8x0.9 smd paste+0 mask+0.051: 1(-0.7,0) 2(0.7,0)
  silkscreen extent -1.39,-0.71 1.39,0.71, body extent -0.8,-0.4 0.8,0.4, height 0.4
Inductor [mm]
  rect 0.8x1.7 smd paste+0 mask+0.051: 1(0.196,0.846) 2(1.496,0.846)
  silkscreen extent -0.25,-0.25 1.95,1.95

## Part data
C1: library part CMP-002-000007-1, LCSC Part Number=C19702, Manufacturer=SAMSUNG(三星), Package=C0603, Design Item ID=CL10A106KP8NNNC, Imported By="JLCAltiumImporter 0.3.8", Manufacturer Part Number=CL10A106KP8NNNC, Source=Schlib1.SchLib
C2 C3 C4 C5 C44 C47: library part CMP-002-000003-1, "100nF (104) ±10% 50V", LCSC Part Number=C1591, Manufacturer=SAMSUNG(三星), Package=C0603, Design Item ID=CL10B104KB8NNNC, Imported By="JLCAltiumImporter 0.3.8", Manufacturer Part Number=CL10B104KB8NNNC, Source=Schlib1.SchLib
C6 C16 C23 C24: library part CMP-002-000002-1, "4.7uF (475) ±10% 16V", LCSC Part Number=C19666, Manufacturer=SAMSUNG(三星), Package=C0603, Design Item ID=CL10A475KO8NNNC, Imported By="JLCAltiumImporter 0.3.8", Manufacturer Part Number=CL10A475KO8NNNC, Source=Schlib1.SchLib
C7: library part CMP-002-000029-1, "100pF ±5% 50V", LCSC Part Number=C14665, Manufacturer=YAGEO(国巨), Package=C0603, Design Item ID=CC0603JRNPO9BN101, Imported By="JLCAltiumImporter 0.3.8", Manufacturer Part Number=CC0603JRNPO9BN101, Source=Schlib1.SchLib
C8 C17 C26 C28 C38 C39: library part CMP-002-000012-1, "47pF (470) ±5% 50V", LCSC Part Number=C1671, Manufacturer=SAMSUNG(三星), Package=C0603, Design Item ID=CL10C470JB8NNNC, Imported By="JLCAltiumImporter 0.3.8", Manufacturer Part Number=CL10C470JB8NNNC, Source=Schlib1.SchLib
C9 C18: library part CMP-002-000031-1, "33pF (330) ±5% 50V", LCSC Part Number=C1663, Manufacturer=SAMSUNG(三星), Package=C0603, Design Item ID=CL10C330JB8NNNC, Imported By="JLCAltiumImporter 0.3.8", Manufacturer Part Number=CL10C330JB8NNNC, Source=Schlib1.SchLib
C10: library part CMP-002-000017-1, LCSC Part Number=C519100, Manufacturer=YAGEO(国巨), Package=C0603, Design Item ID=CC0603BRNPO9BN1R5, Imported By="JLCAltiumImporter 0.3.8", Manufacturer Part Number=CC0603BRNPO9BN1R5, Source=Schlib1.SchLib
C11 C13 C19 C20: library part CMP-002-000024-1, "3.3pF (3R3) ±0.25pF 50V", LCSC Part Number=C1660, Manufacturer=FH(风华), Package=C0603, Design Item ID=0603CG3R3C500NT, Imported By="JLCAltiumImporter 0.3.8", Manufacturer Part Number=0603CG3R3C500NT, Source=Schlib1.SchLib
C12: library part CMP-002-000025-1, LCSC Part Number=C913582, Manufacturer=muRata(村田), Package=C0603, Design Item ID=GQM1875C2E1R2BB12D, Imported By="JLCAltiumImporter 0.3.8", Manufacturer Part Number=GQM1875C2E1R2BB12D, Source=Schlib1.SchLib
C14 C33 C34 C37 C40 C41: library part CMP-002-000023-1, Package=C0603, Design Item ID=GCM1885C2A7R5BA16D, Imported By="JLCAltiumImporter 0.3.8", Source=Schlib1.SchLib
C15: library part CMP-002-000023-1, LCSC Part Number=C17388964, Manufacturer=muRata(村田), Package=C0603, Design Item ID=GCM1885C2A7R5BA16D, Imported By="JLCAltiumImporter 0.3.8", Manufacturer Part Number=GCM1885C2A7R5BA16D, Source=Schlib1.SchLib
C21 C27: library part CMP-002-000011-1, "100nF (104) ±10% 50V", LCSC Part Number=C1591, Manufacturer=SAMSUNG(三星), Package=C0603, Design Item ID=CL10B104KB8NNNC, Imported By="JLCAltiumImporter 0.3.8", Manufacturer Part Number=CL10B104KB8NNNC, Source=Schlib1.SchLib
C22 C42 C43 C45: library part CMP-002-000010-1, "1nF (102) ±10% 50V", LCSC Part Number=C1588, Manufacturer=SAMSUNG(三星), Package=C0603, Design Item ID=CL10B102KB8NNNC, Imported By="JLCAltiumImporter 0.3.8", Manufacturer Part Number=CL10B102KB8NNNC, Source=Schlib1.SchLib
C25 C46: library part CMP-002-000001-1, LCSC Part Number=C86295, Manufacturer=SAMSUNG(三星), Package=C0603, Design Item ID=CL10A226MP8NUNE, Imported By="JLCAltiumImporter 0.3.8", Manufacturer Part Number=CL10A226MP8NUNE, Source=Schlib1.SchLib
C29: library part CMP-002-000019-1, LCSC Part Number=C107036, Manufacturer=YAGEO(国巨), Package=C0603, Design Item ID=CC0603JRNPO9BN130, Imported By="JLCAltiumImporter 0.3.8", Manufacturer Part Number=CC0603JRNPO9BN130, Source=Schlib1.SchLib
C30: library part CMP-002-000027-1, LCSC Part Number=C519393, Manufacturer=YAGEO(国巨), Package=C0603, Design Item ID=CC0603JRNPO9BN110, Imported By="JLCAltiumImporter 0.3.8", Manufacturer Part Number=CC0603JRNPO9BN110, Source=Schlib1.SchLib
C31: library part CMP-002-000004-1, "2.2pF (2R2) ±0.25pF 50V", LCSC Part Number=C1651, Manufacturer=FH(风华), Package=C0603, Design Item ID=0603CG2R2C500NT, Imported By="JLCAltiumImporter 0.3.8", Manufacturer Part Number=0603CG2R2C500NT, Source=Schlib1.SchLib
C32: library part CMP-002-000030-1, LCSC Part Number=C519375, Manufacturer=YAGEO(国巨), Package=C0603, Design Item ID=CC0603CRNPO9BN4R3, Imported By="JLCAltiumImporter 0.3.8", Manufacturer Part Number=CC0603CRNPO9BN4R3, Source=Schlib1.SchLib
C35: library part CMP-002-000021-1, LCSC Part Number=C100042, Manufacturer=YAGEO(国巨), Package=C0603, Design Item ID=CC0603KRX7R9BB103, Imported By="JLCAltiumImporter 0.3.8", Manufacturer Part Number=CC0603KRX7R9BB103, Source=Schlib1.SchLib
C36: library part CMP-002-000026-1, LCSC Part Number=C513620, Manufacturer=YAGEO(国巨), Package=C0603, Design Item ID=CC0603BRNPO9BN2R0, Imported By="JLCAltiumImporter 0.3.8", Manufacturer Part Number=CC0603BRNPO9BN2R0, Source=Schlib1.SchLib
C48 C49: library part CMP-002-000018-1, LCSC Part Number=C107034, Manufacturer=YAGEO(国巨), Package=C0603, Design Item ID=CC0603JRNPO9BN120, Imported By="JLCAltiumImporter 0.3.8", Manufacturer Part Number=CC0603JRNPO9BN120, Source=Schlib1.SchLib
J1: library part CMP-000001-2
L1: library part CMP-009-000006-1, LCSC Part Number=C98076, Manufacturer=muRata(村田), Package=L0603, Design Item ID=LQW18AN47NG00D, Imported By="JLCAltiumImporter 0.3.8", Manufacturer Part Number=LQW18AN47NG00D, Source=Schlib1.SchLib
L2: library part CMP-009-000005-1, LCSC Part Number=C98073, Manufacturer=muRata(村田), Package=IND-SMD_L1.6-W0.8-1, Design Item ID=LQW18AN33NG00D, Imported By="JLCAltiumImporter 0.3.8", Manufacturer Part Number=LQW18AN33NG00D, Source=Schlib1.SchLib
L3: library part CMP-009-000015-1, LCSC Part Number=C6807999, Manufacturer=APV(爱普微), Package=IND-SMD_L1.6-W0.8-1, Design Item ID=AHW1608C-6N8JTF, Imported By="JLCAltiumImporter 0.3.8", Manufacturer Part Number=AHW1608C-6N8JTF, Source=Schlib1.SchLib
L4: library part CMP-009-000007-1, LCSC Part Number=C98083, Manufacturer=muRata(村田), Package=IND-SMD_L1.6-W0.8-1, Design Item ID=LQW18AN6N2C00D, Imported By="JLCAltiumImporter 0.3.8", Manufacturer Part Number=LQW18AN6N2C00D, Source=Schlib1.SchLib
L6: library part CMP-009-000016-1, LCSC Part Number=C98087, Manufacturer=muRata(村田), Package=IND-SMD_L1.6-W0.8-1, Design Item ID=LQW18AN8N2D00D, Imported By="JLCAltiumImporter 0.3.8", Manufacturer Part Number=LQW18AN8N2D00D, Source=Schlib1.SchLib
L7: library part CMP-009-000012-1, LCSC Part Number=C113127, Manufacturer=muRata(村田), Package=L0603, Design Item ID=LQW18AN4N3C00D, Imported By="JLCAltiumImporter 0.3.8", Manufacturer Part Number=LQW18AN4N3C00D, Source=Schlib1.SchLib
L8: library part CMP-009-000010-1, LCSC Part Number=C701196, Manufacturer=muRata(村田), Package=IND-SMD_L1.6-W0.8-1, Design Item ID=LQW18AN11NG00D, Imported By="JLCAltiumImporter 0.3.8", Manufacturer Part Number=LQW18AN11NG00D, Source=Schlib1.SchLib
L9 L15: library part CMP-009-000013-1, LCSC Part Number=C98068, Manufacturer=muRata(村田), Package=IND-SMD_L1.6-W0.8-1, Design Item ID=LQW18AN12NG00D, Imported By="JLCAltiumImporter 0.3.8", Manufacturer Part Number=LQW18AN12NG00D, Source=Schlib1.SchLib
L10 L12 L13: library part CMP-009-000010-1, LCSC Part Number=C95177, Manufacturer=YAGEO, Package=R0603, Design Item ID=RC0603JR-070RL, Imported By="JLCAltiumImporter 0.3.8", Manufacturer Part Number=RC0603JR-070RL, Source=Schlib1.SchLib
L11: library part CMP-009-000011-1, "15nH ±2%", LCSC Part Number=C86132, Manufacturer=muRata(村田), Package=L0603, Design Item ID=LQW18AN15NG00D, Imported By="JLCAltiumImporter 0.3.8", Manufacturer Part Number=LQW18AN15NG00D, Source=Schlib1.SchLib
L14: JLCPCB Part Class="Extended Part", LCSC Part Name="1uH ±20% 4.6A", Manufacturer=YOUCHI(佑驰), ManufacturerPart=HCTC-201610-1R0-M, AddInBom=yes, ConvertToPcb=yes, Datasheet=https://item.szlcsc.com/datasheet/HCTC-201610-1R0-M/51586942.html, FootprintName=IND-SMD_L2.0-W1.6_MTQH201610S, ModelId=354c7c64a6c14853a17e163bf9c9633c, ModelName=IND-SMD_L2.0-W1.6_MTQH201610S, ModelTransform=78.74,63.3857,0,0,0,0,0,0,0, Supplier=LCSC, Supplier Footprint=0806, SupplierPart=C49190099, Symbol=HCTC-201610-1R0-M
LED1 LED2 LED3: library part CMP-003-000000-1, LCSC Part Number=C219226, Manufacturer=HONGLITRONIC(鸿利光电), Package=LED0603-RD, Design Item ID=HL-PST-1608H233W(9000-16000K), Imported By="JLCAltiumImporter 0.3.8", Manufacturer Part Number=HL-PST-1608H233W(9000-16000K), Source=Schlib1.SchLib
R1: library part CMP-004-000004-3, "1KΩ (1001) ±1%", Package=R0603, Design Item ID=RC0603FR-071KL, Imported By="JLCAltiumImporter 0.3.8", Source=Schlib1.SchLib
R2 R15: library part CMP-004-000004-3, "1KΩ (1001) ±1%", LCSC Part Number=C22548, Manufacturer=YAGEO(国巨), Package=R0603, Design Item ID=RC0603FR-071KL, Imported By="JLCAltiumImporter 0.3.8", Manufacturer Part Number=RC0603FR-071KL, Source=Schlib1.SchLib
R3 R4 R6 R9: library part CMP-004-000001-1, LCSC Part Number=C98220, Manufacturer=YAGEO(国巨), Package=R0603, Design Item ID=RC0603FR-0710KL, Imported By="JLCAltiumImporter 0.3.8", Manufacturer Part Number=RC0603FR-0710KL, Source=Schlib1.SchLib
R5 R7 R10 R13 R14: library part CMP-004-000002-1, LCSC Part Number=C105580, Manufacturer=YAGEO(国巨), Package=R0603, Design Item ID=RC0603FR-075K1L, Imported By="JLCAltiumImporter 0.3.8", Manufacturer Part Number=RC0603FR-075K1L, Source=Schlib1.SchLib
R8: library part CMP-004-000000-1, "2KΩ (2001) ±1%", LCSC Part Number=C22975, Manufacturer=UNI-ROYAL(厚声), Package=R0603, Design Item ID=0603WAF2001T5E, Imported By="JLCAltiumImporter 0.3.8", Manufacturer Part Number=0603WAF2001T5E, Source=Schlib1.SchLib
R11: library part CMP-004-000010-1, LCSC Part Number=C14675, Manufacturer=YAGEO(国巨), Package=R0603, Design Item ID=RC0603FR-07100KL, Imported By="JLCAltiumImporter 0.3.8", Manufacturer Part Number=RC0603FR-07100KL, Source=Schlib1.SchLib
R12: library part CMP-004-000011-1, LCSC Part Number=C861454, Manufacturer=YAGEO(国巨), Package=R0603, Design Item ID=RT0603BRD07511KL, Imported By="JLCAltiumImporter 0.3.8", Manufacturer Part Number=RT0603BRD07511KL, Source=Schlib1.SchLib
R16: library part CMP-004-000009-1, LCSC Part Number=C137671, Manufacturer=YAGEO(国巨), Package=R0603, Design Item ID=RC0603FR-0791KL, Imported By="JLCAltiumImporter 0.3.8", Manufacturer Part Number=RC0603FR-0791KL, Source=Schlib1.SchLib
SW1 SW2: library part CMP-005-000000-1, LCSC Part Number=C720477, Manufacturer=XUNPU(讯普), Package=SW-SMD_L3.9-W3.0-P4.45, Design Item ID=TS-1088-AR02016, Imported By="JLCAltiumImporter 0.3.8", Manufacturer Part Number=TS-1088-AR02016, Source=Schlib1.SchLib
U1: library part CMP-006-000005-1, LCSC Part Number=C3013946, Manufacturer=ESPRESSIF(乐鑫), Package=WIRELM-SMD_ESP32-S3-WROOM-1U, Design Item ID=ESP32-S3-WROOM-1U-N16R8, Imported By="JLCAltiumImporter 0.3.8", Manufacturer Part Number=ESP32-S3-WROOM-1U-N16R8, Source=Schlib1.SchLib
U2: library part CMP-006-000001-2, LCSC Part Number=C80171, Manufacturer=SEMTECH, Package=QFN-28_L6.0-W6.0-P0.65-BL-EP, Design Item ID=SX1276IMLTRT, Imported By="JLCAltiumImporter 0.3.8", Manufacturer Part Number=SX1276IMLTRT, Source=Schlib1.SchLib
U3 U4: library part CMP-006-000006-1, LCSC Part Number=C470892, Manufacturer=pSemi(游隼半导体), Package=SC-70-6_L2.2-W1.3-P0.65-LS2.1-BL, Design Item ID=PE4259-63, Imported By="JLCAltiumImporter 0.3.8", Manufacturer Part Number=PE4259-63, Source=Schlib1.SchLib
U5: library part CMP-006-000004-2, LCSC Part Number=C5121473, Manufacturer=MICROCHIP(美国微芯), Package=QFN-20_L4.0-W4.0-P0.50-BL-EP2.7, Design Item ID=MCP73871-2CCI/ML, Imported By="JLCAltiumImporter 0.3.8", Manufacturer Part Number=MCP73871-2CCI/ML, Source=Schlib1.SchLib
U6: library part CMP-006-000002-3, LCSC Part Number=C1849531, Manufacturer=TI(德州仪器), Package=VSON-10-HR_L3.0-W2.0-P0.50-BL_TI_DLA, Design Item ID=TPS63802DLAT, Imported By="JLCAltiumImporter 0.3.8", Manufacturer Part Number=TPS63802DLAT, Source=Schlib1.SchLib
UFL1 UFL2: library part CMP-006-000012-1, "3310472210，IPE-X IPX，", LCSC Part Number=C88374, Manufacturer=HRS(广濑), Package=RF-SMD_FRF05002-JSS103M, Design Item ID=U.FL-R-SMT-1(80), Imported By="JLCAltiumImporter 0.3.8", Manufacturer Part Number=U.FL-R-SMT-1(80), Source=Schlib1.SchLib
USB1: library part CMP-006-000003-1, LCSC Part Number=C5187472, Manufacturer="SHOU HAN(首韩)", Package=USB-TYPE-C-SMD_TYPE-C-16P-QTWT, Design Item ID="TYPE-C 16P QTWT", Imported By="JLCAltiumImporter 0.3.8", Manufacturer Part Number="TYPE-C 16P QTWT", Source=Schlib1.SchLib
X2: library part CMP-006-000013-1, LCSC Part Number=C2965582, Manufacturer=YXC(扬兴晶振), Package=CRYSTAL-SMD_4P-L2.0-W1.6-BL, Design Item ID=XL7EL89CKI-111YLC-32M, Imported By="JLCAltiumImporter 0.3.8", Manufacturer Part Number=XL7EL89CKI-111YLC-32M, Source=Schlib1.SchLib

## Free pads (board coordinates)
  round 177.17 hole 118.11: 4(6025,2675)

## Via types
v1: diameter 24, hole 12, Top Layer to Bottom Layer, 362 vias
v2: diameter 23.62, hole 11.81, Top Layer to Bottom Layer, 54 vias
v3: diameter 18, hole 8, Top Layer to Bottom Layer, 46 vias

## Nets (pads, with @x,y where several pads share a name; then routed paths per layer and width w, separated by ;. In a path a pad name is that pad's centre, name@x,y a point inside that pad or via, vN(x,y) a via of type N, cw(c..) or ccw(c..) an arc to the next point about the centre after c; other vN are vias at no path point)
+3.3: C1.2 C2.2 C3.1 C21.2 C26.2 C27.2 C43.2 C45.2 C46.2 C47.2 R3.1 R4.1 R11.2 R12.2 U1.2 U2.3 U2.14 U2.24 U3.6 U4.6 U6.6 | length 2070.1
  Top Layer w10.64: U3.6@5487.59,1257.93 U3.6@5487.59,1258
  Top Layer w12: C45.2@5422.56,2550 v1(5460,2550) ; C45.2@5425,2552.44 5425,2579 cw(c5441.07,2579) 5441.07,2595.07 U4.6@5496.41,2595.07 ; U3.6@5487.59,1258 C43.2@5564,1258 ; R3.1@6854.66,2660 v1(6915,2660)
  Top Layer w12.5: C26.2@5539.56,2036 cw(c5541.53,2036) 5541.53,2037.97 U2.24@5612.57,2037.97 ; 5705,1859 5705,1851 ccw(c5709,1851) 5709,1847 cw(c5709,1845) 5711,1845 v3(5711,1823) ; 5705.03,1859 U2.3@5705.03,1894.33 ; U2.14@5848.67,2089.15 5848.96,2089.44 5880,2089.44 ; v1(5860,2140) 5860,2109.44 ccw(c5880,2109.44) 5880,2089.44 ; C21.2@5920,2089.44 5880,2089.44 ; v3(6066,1489) ccw(c6078.66,1489) 6078.66,1476.34 R11.2@6113,1476.34 R11.2@6111.66,1475 ; R12.2@6113,1411.66 6113.66,1411.66 R11.2@6113.66,1476
  Top Layer w20: C43.2@5564,1258 v1(5608,1258)
  L3 PWR w12: v1(5460,2550) 5461.24,2550 cw(c5461.24,2463.65) 5547.59,2463.65 ccw(c5591.24,2463.65) 5591.24,2420 5687.64,2420 ; 5770,2135 5770,2337.64
  L3 PWR w12.5: 5929,1516 ccw(c5935,1516) 5935,1510 6045,1510 cw(c6045,1489) v3(6066,1489) ; v1(5937,1459) cw(c5954,1459) 5954,1476
  L3 PWR w20: 5687.64,2420 cw(c5687.64,2337.64) 5770,2337.64
  L3 PWR w35: 5770,2135 ccw(c5815,2135) 5815,2090 cw(c5815,1995) 5910,1995 5910,1715
  Bottom Layer w12.5: C27.2@5538.56,2037 v1(5539,2037) ; v3(5711,1823) cw(c5711,1817) 5717,1817 C3.1@5717,1798.56
  other v1: 5877,1369 5907,1369 5937,1369 5877,1399 5907,1399 5937,1399 5877,1429 5907,1429 5937,1429 5877,1459 5907,1459 6158,1648 6188,1648 6218,1648 6248,1648 6158,1678 6188,1678 6218,1678 6248,1678
+5: C16.2 LED1.2 LED2.2 LED3.2 U5.2 U5.3 U5.4 U5.9 U5.17 U5.18 U5.19 USB1.A4B9 USB1.B4A9 | length 646.8
  Top Layer w10: v3(6287,1136) 6287,1152 cw(c6299,1152) 6299,1164 ccw(c6299,1188) 6323,1188 6323,1199 cw(c6356,1199) 6356,1232 6362,1232 ccw(c6362,1241) 6371,1241 6371,1244 6371.58,1244 U5.2@6371.58,1270.63 ; v3(6343,1185) cw(c6378,1185) 6378,1220 ccw(c6378,1233) 6391,1233 6391.26,1233 U5.3@6391.26,1270.63 ; v3(6371,1185) cw(c6392,1185) 6392,1206 6396,1206 ccw(c6396,1220.95) 6410.95,1220.95 U5.4@6410.95,1270.63 ; U5.9@6470,1369.06 6505.94,1369.06 cw(c6505.94,1329) 6546,1329 6546,1303 ccw(c6564,1303) 6564,1285
  Top Layer w12.5: v3(6420,1080) 6420,1052.01 LED1.2@6420.49,1052.01 ; LED2.2@6539.98,1052.01 v3(6540,1080) ; LED3.2@6661,1053.01 v3(6661,1081)
  other v2: 6584,1271 6614,1271 6644,1271 6584,1301 6614,1301 6644,1301 6170,1370 6200,1370 6230,1370 6260,1370 6170,1400 6200,1400 6230,1400 6260,1400 6589,1459 6619,1459 6649,1459 6589,1489 6619,1489 6649,1489
CC1: R14.2 USB1.A5 | length 315.6
  Top Layer w12.5: USB1.A5@6714.13,1330.79 6779.22,1330.79 cw(c6779.22,1315) 6795,1315 6795,1090 R14.2@6795.68,1090
CC2: R13.2 USB1.B5 | length 295.4
  Top Layer w10.64: USB1.B5@6714.13,1448.89 6778.9,1448.89 ccw(c6778.9,1465) 6795,1465 6795,1670 R13.2@6795.34,1670
DIO0: U1.4 U2.8 | length 495.2
  Top Layer w10: U2.8@5848.67,1935.61 6279.39,1935.61 cw(c6279.39,1925) 6290,1925 6290,1885 ccw(c6295,1885) U1.4@6295,1880
DIO1: U1.5 U2.9 | length 562
  Top Layer w10: U2.9@5848.67,1961.2 6308.8,1961.2 cw(c6308.8,1925) 6345,1925 U1.5@6345,1880
DIO2: U1.6 U2.10 | length 624.5
  Top Layer w10: U2.10@5848.67,1986.79 6328.21,1986.79 cw(c6328.21,1920) 6395,1920 U1.6@6395,1880
DIO3: U1.7 U2.11 | length 685.8
  Top Layer w10: U2.11@5848.67,2012.38 6345,2012.38 cw(c6345,1912.38) 6445,1912.38 U1.7@6445,1880
DIO4: U1.12 U2.12 | length 961.4
  Top Layer w10: U2.12@5848.67,2037.97 6595,2037.97 cw(c6595,1937.97) 6695,1937.97 U1.12@6695,1880
DIO5: U1.17 U2.13 | length 1001
  Top Layer w10: U2.13@5848.67,2063.56 6656.44,2063.56 cw(c6656.44,2039.42) 6673.51,2056.49 6677.34,2052.66 ccw(c6685,2060.33) 6685,2049.49 U1.17@6845.39,2049.49
ESP_BOOT: R3.2 SW1.2 U1.27 | length 209.8
  Top Layer w10: SW1.2@6711.02,2695 cw(c6716.02,2695) 6716.02,2700 6775,2700 cw(c6775,2679.66) 6795.34,2679.66 R3.2@6795.34,2660 6795.34,2568.98 U1.27@6795,2568.98
ESP_EN: C6.2 R4.2 SW2.2 U1.3 | length 332.5
  Top Layer w10: U1.3@6245,1880 6245,1840 ccw(c6255,1840) 6255,1830 6290,1830 cw(c6290,1820) 6300,1820 6300,1787.9 6299.66,1787.9 R4.2@6299.66,1720 6345,1720 ccw(c6345,1730) 6355,1730 6355,1740 cw(c6365,1740) 6365,1750 SW2.2@6404,1750
FEM_CPS: R15.1 U1.8 | length 1737.9
  Top Layer w12.5: v1(5259,1324) cw(c5260,1324) 5260,1325 R15.1@5307.34,1325 ; v1(6494,1816) ccw(c6494,1817) 6495,1817 U1.8@6495,1880
  Bottom Layer w12.5: v1(5259,1324) 5244,1324 cw(c5244,1342) 5226,1342 5226,1389 cw(c5248,1389) 5248,1411 5415.36,1411 ccw(c5415.36,1496.54) 5475.85,1436.05 ccw(c5409.6,1502.29) 5503.28,1501.52 cw(c5598.66,1513.83) 5598.66,1610 6285,1610 ccw(c6285,1635) 6310,1635 cw(c6365,1635) 6365,1690 6405,1690 ccw(c6405,1779) 6494,1779 v1(6494,1816)
FEM_CTX: R2.1 U1.9 | length 1521.6
  Top Layer w12.5: R2.1@5676.66,2523 5723,2523 cw(c5723,2522) v1(5724,2522) ; U1.9@6545,1880 v1(6545,1936)
  Bottom Layer w12.5: v1(5724,2522) 5740,2522 cw(c5740,2507) 5755,2507 5755,2284 cw(c5741,2284) 5750.98,2274.19 cw(c5741,2284) 5750.9,2274.1 cw(c5737.59,2287.41) 5737.52,2268.59 ; 5737.47,2268.59 ccw(c5737.59,2237) 5706,2237 5706,2149.4 ccw(c5746.4,2149.4) 5746.4,2109 6445,2109 cw(c6445,2009) 6545,2009 v1(6545,1936)